# Altium PCB PCB-LAYOUT.PcbDoc (part 2 of 3)
Units mm, origin at the board's own origin, x right, y up, seen from the top; angles counter-clockwise.
Board outline 90 x 80.5 mm, 4 copper layers (Top Layer, Int1 (GND), Int2 (PWR), Bottom Layer), stack 1.564 mm thick; 224 components, 118 nets, 645 pads, 657 vias.
Unrouted connection lines stored in the file: 1.
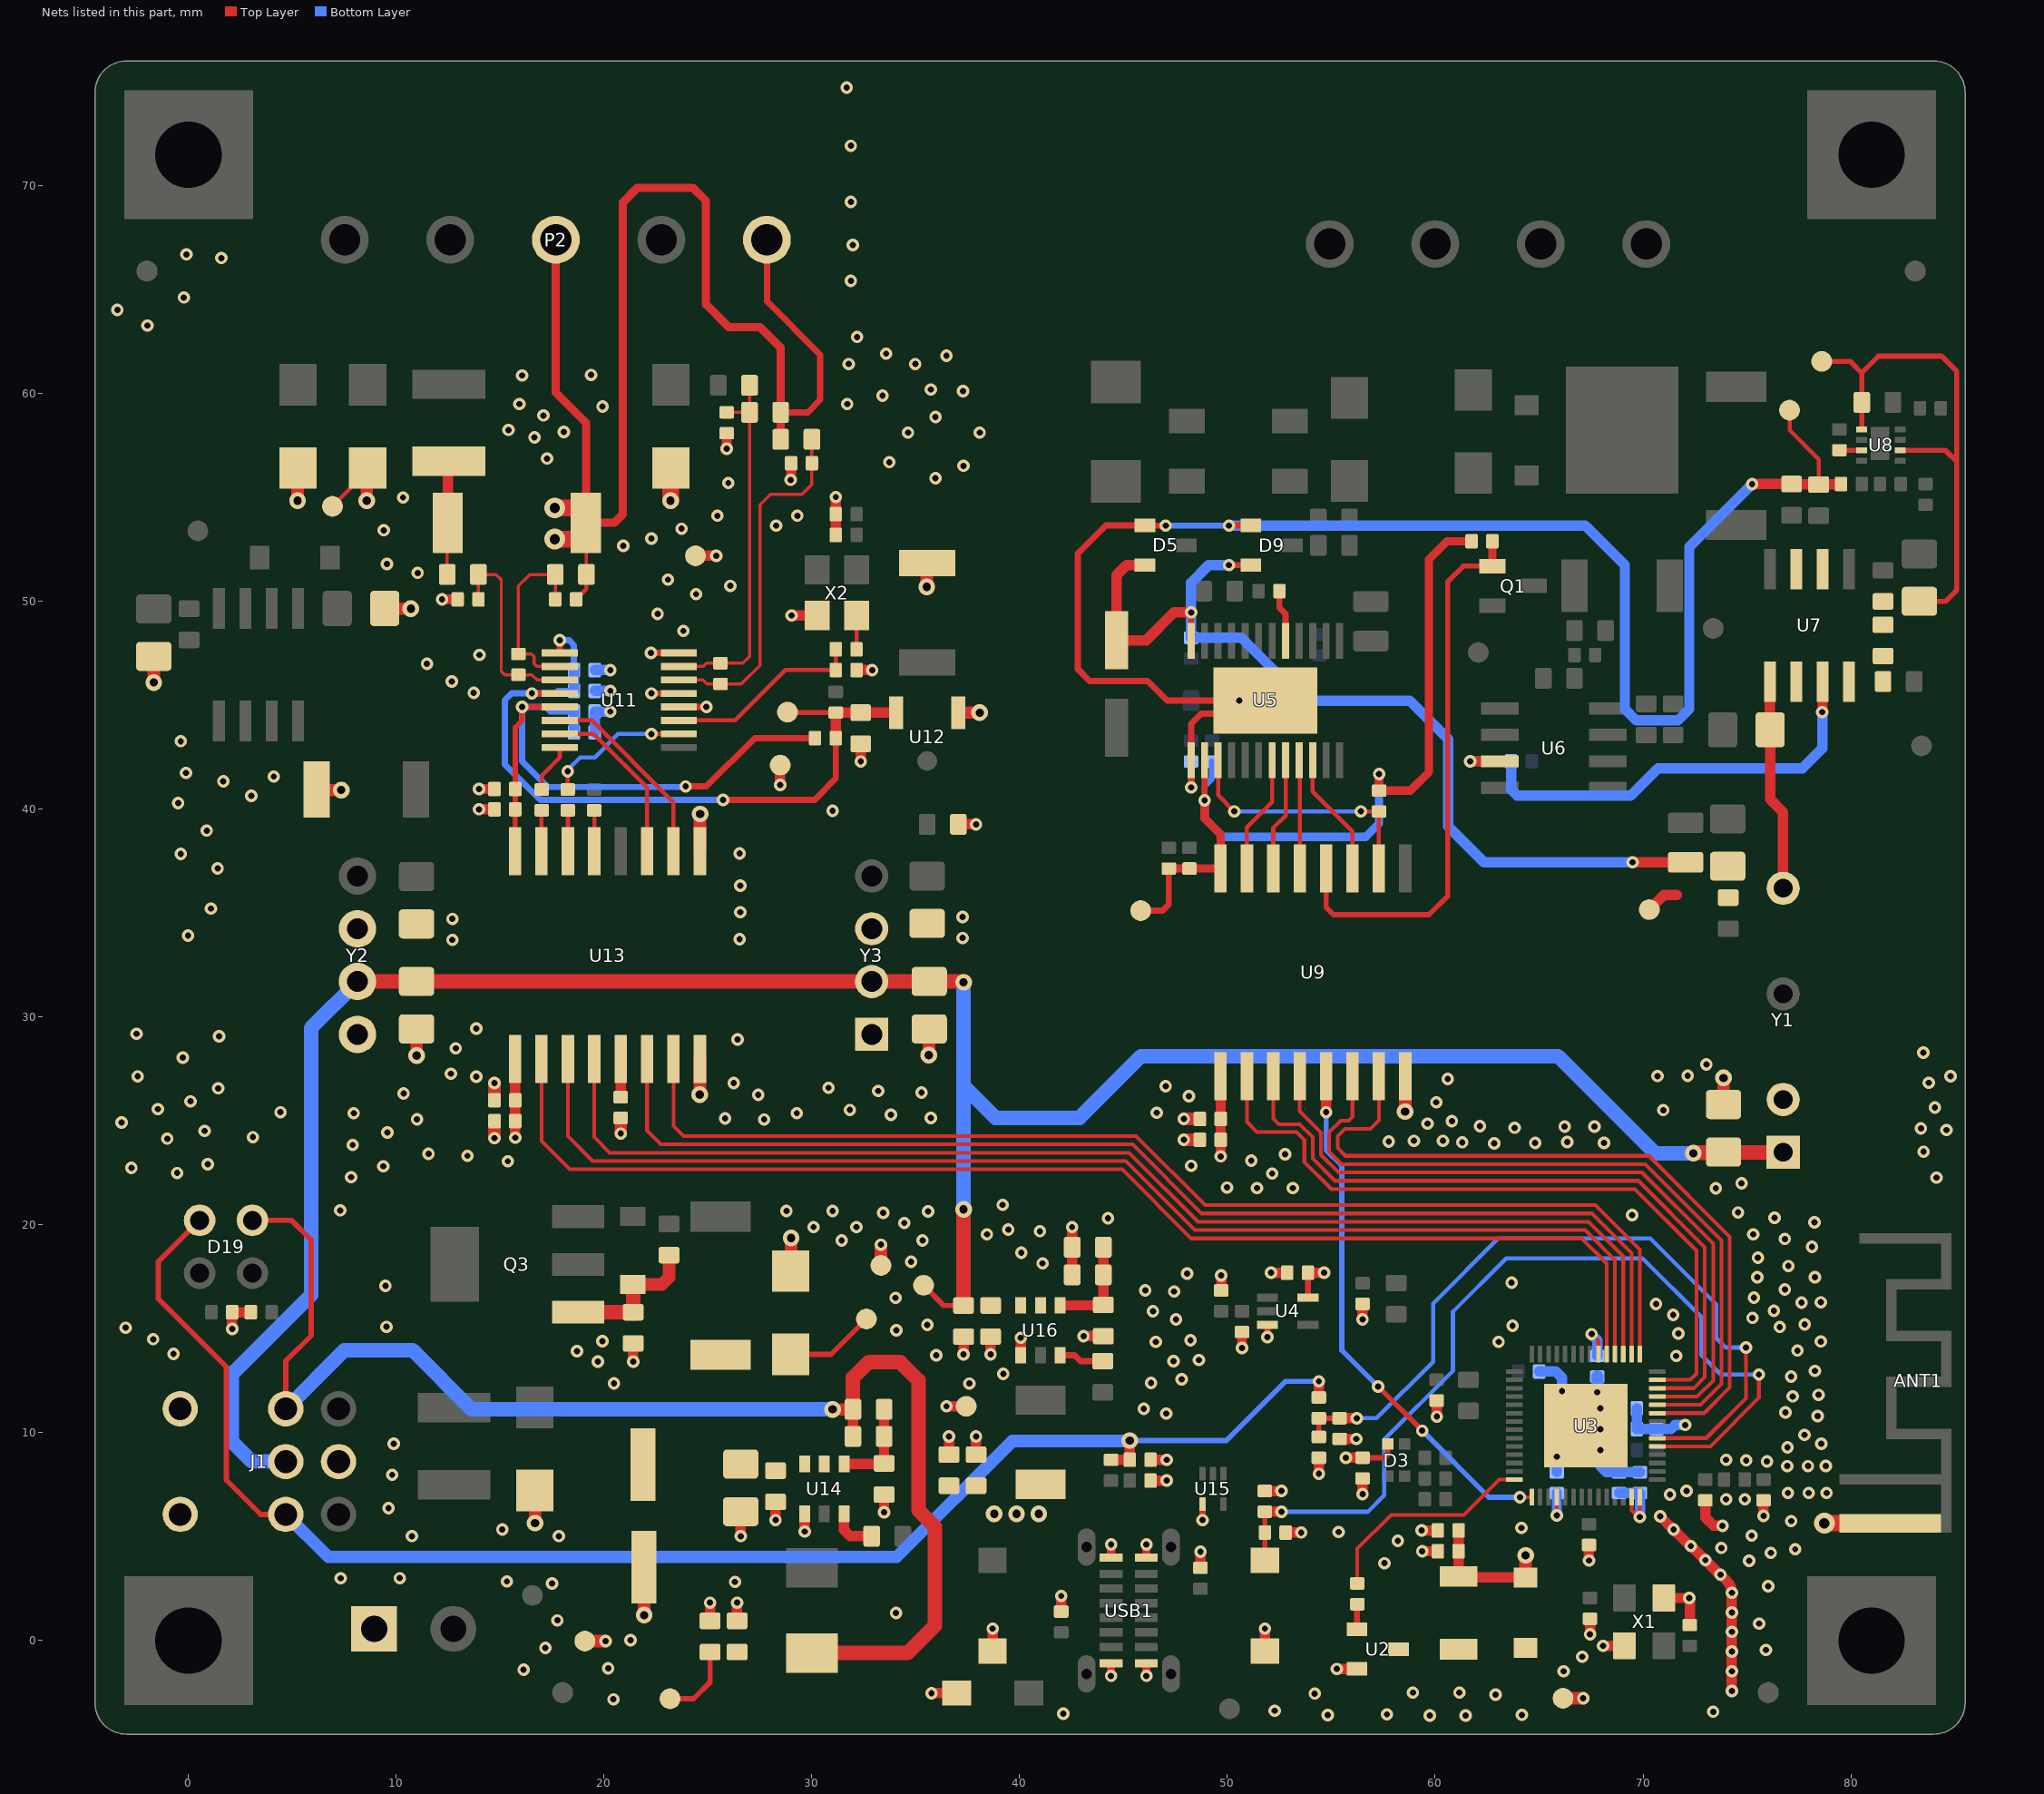
[diagram p4: the nets of this part, all layers, seen from the top]

## Part data
ANT1: library part ANT_IFA_USB_2_4GHZ_50R, "Inverted F 2.4GHz ISM PCB Antenna 50 Ohm", ComponentLink1Description=Datasheet, ComponentLink1URL=https://www.ti.com/lit/an/swra117d/swra117d.pdf
C1 C3 C42 C48 C57: library part CAP_0402, "[C15525]"
C2 C4 C8 C9 C10 C15 C16 C17 C18 C20 C21 C22 C31 C33 C34 C39 C43 C49 C58 C63 C64 C76: library part CAP_0402, "[C307331]"
C5 C6 C7 C32 C35 C40 C62 C65: library part CAP_0402, "[C52923]"
C11: library part CAP_0402, "[C76899]"
C12: library part CAP_0402, "[C76900]"
C13 C14: library part CAP_0402, "Capacitor SMD 0402 [C1548]"
C19: library part CAP_0402, "[C1532]"
C23: library part CAP_ALEL_5x5.4, "[C46550416]"
C24: library part CAP_0805, "[C98192]"
C25 C27 C54 C67: library part CAP_0805, "[C440198]"
C26: library part CAP_0603, "[C307331]"
C28 C44 C45 C46 C47: library part CAP_0805, "[C28323]"
C29: library part CAP_0402, "[C1538]"
C30 C36 C37 C38: library part CAP_0603, "[C19702]"
C41: library part CAP_0402, "[C23733]"
C50 C52: library part CAP_0402, "[C106251]"
C51: library part CAP_0402, "[C880636]"
C53: library part CAP_0805, "[C1779]"
C55: library part CAP_0603, "[C15849]"
C56: library part CAP_0603, "[C96446]"
C59 C61: library part CAP_0402, "[C1523]"
C60: library part CAP_0402, "[C15195]"
C66: library part CAP_ALEL_6.3x5.4, "[C48971023]"
C68 C69 C79: library part CAP_0603, "[C14663]"
C70: library part CAP_0603, "[C1622]"
C71: library part CAP_0603, "[C1671]"
C72 C73 C81 C82: library part CAP_0603, "[C59461]"
C74 C75: library part CAP_0402, "[C12530]"
C77 C78: library part CAP_0603, "[C194427]"
C80: library part CAP_0603, "[C39148]"
D1 D6 D11: library part 1N4148W, "[C917030]"
D2: library part LED_0603_BLUE, "[C965807]"
D3: library part RGB_LED_0805, "[C965848]"
D4: library part LED_0603_YELLOW, "[C89811]"
D5 D9: library part BAT54S_C7420333, "[C7420333]"
D7: library part SMBJ13CA, "[C8848]"
D8 D12 D13 D14: library part SMAJ33CA, "[C19077549]"
D10: library part SMAJ24CA, "[C113963]"
D15: library part BZT52C15, "[C19077412]"
D16 D17: library part SMAJ30CA, "[C10755]"
D18: library part SMF6.0CA, "[C123791]"
D19: library part TJ-L3F2LTQYKMQFLC7K-A5, "[C20613347]"
F1 F2: library part JK-nSMD010/60V, "[C2830236]"
F3: library part BSMD1812-010-60V, "[C883137]"
F4: library part mSMD050-60V, "[C70113]"
FB1: library part FB_0402, "[C76891]"
J1: library part 2MD3T2B1M6RES, "[C545196]"
L1: library part IND_0402, "[C18216]"
L2: library part IND_0402, "[C77108]"
L3: library part FXL0530-6R8-M, "[C177249]"
L4: library part IND-SMD_L4.4-W4.2, "[C5349668]"
P1: "[C2915641]", Color=Green, Current Rating (Max)=18A, JLCPCB Part Class="Extended Part", LCSC Part Name="5.08mm 1x3P 排数:1 每排P数:3 直插", Manufacturer=KANGNEX(康奈克斯电气), Manufacturer Part=WJ500V-5.08-3P, Operating Temperature Range=-40℃~+105℃, Voltage Rating (Max)=250V, Add into BOM=yes, Convert to PCB=yes, Datasheet=https://atta.szlcsc.com/upload/public/pdf/source/20191225/C72334_8A5EF831D67650233B6B1E3F2BC06274.pdf, Device=WJ500V-5.08-3P, Mounting Style=Straight, Number of Pins=3P, Number of PINs Per Row=3, Number of Rows=1, Pitch=5.08mm, Structure=1x3P, Supplier=LCSC, Supplier Footprint=插件,P=5.08mm, Supplier Part=C72334, Symbol=WJ500V-5.08-3P-14-00A, Wire Gauge - AWG=14~30, Wire Gauge - mm2=2.5
P2: "[C2927513]", Color=Green, Current Rating (Max)=18A, JLCPCB Part Class="Extended Part", LCSC Part Name="5.08mm 1x3P 排数:1 每排P数:3 直插", Manufacturer=KANGNEX(康奈克斯电气), Manufacturer Part=WJ500V-5.08-3P, Operating Temperature Range=-40℃~+105℃, Voltage Rating (Max)=250V, Add into BOM=yes, Convert to PCB=yes, Datasheet=https://atta.szlcsc.com/upload/public/pdf/source/20191225/C72334_8A5EF831D67650233B6B1E3F2BC06274.pdf, Device=WJ500V-5.08-3P, Mounting Style=Straight, Number of Pins=3P, Number of PINs Per Row=3, Number of Rows=1, Pitch=5.08mm, Structure=1x3P, Supplier=LCSC, Supplier Footprint=插件,P=5.08mm, Supplier Part=C72334, Symbol=WJ500V-5.08-3P-14-00A, Wire Gauge - AWG=14~30, Wire Gauge - mm2=2.5
P3: library part WJ15EDGRC-3.81-2P, "[C8387]"
P4: library part WJ15EDGK-3.81-2P, "[C8466]"
Q1: library part AO3400A, "[C20917]"
Q2: library part IRLR3110ZTRPBF, "[C67277]"
Q3: library part BSP315P, "[C5246415]"
R1 R6: library part RES_0402, "[C138045]"
R2 R5 R8 R53 R54: library part RES_0402, "[C11702]"
R3 R4 R51 R52: library part RES_0402, "[C25905]"
R7 R9 R31 R32 R33 R39: library part RES_0402, "[C25118]"
R10: library part RES_0603, "[C23162]"
R11 R47: library part RES_0603, "[C25803]"
R12: library part RES_0402, "[C25741]"
R13: library part RES_0805, "[C17414]"
R14 R17: library part RES_0603, "[C23140]"
R15 R41 R44: library part RES_0402, "[C25744]"
R16 R34: library part RES_2512, "[C2775912]"
R18 R28: library part RES_0603, "[C23182]"
R19: library part RES_0603, "[C2933150]"
R20: library part RES_0603, "[C21190]"
R21: library part RES_0603, "[C4190]"
R22: library part RES_0603, "[C23350]"
R23: library part RES_0805, "[C17475]"
R24: library part RES_0603, "[C2998136]"
R25 R36 R38: library part RES_0402, "[C25077]"
R26: library part RES_0402, "[C51048313]"
R27: library part RES_0402, "[C2998054]"
R29: library part RES_2010, "[C2999618]"
R30 R35: library part RES_0603, "[C23041]"
R37: library part RES_2010, "[C2933989]"
R40: library part RES_0603, "[C23129]"
R42: library part RES_0603, "[C25804]"
R43: library part RES_0603, "[C23125]"
R45: library part RES_2512, "[C25489]"
R46: library part RES_0603, "[C22883]"
R48 R56: library part RES_0603, "[C137745]"
R49: library part RES_0402, "[C93947]"
R50: library part RES_0402, "[C2909379]"
R55: library part RES_0603, "[C23266]"
SW1 SW2: "[C720477]", Actuator/Cap Color=Black, Contact Current=50mA, Insulation Resistance=100MΩ, JLCPCB Part Class="Extended Part", LCSC Part Name="4*3*2mm 立贴 轻触开关", Manufacturer=XUNPU(讯普), Operating Force=160gf, Operating Temperature=-30℃~+80℃, Voltage Rating (DC)=12V, Actuator Style="Round Button", Add into BOM=yes, Circuit=SPST, Convert to PCB=yes, Datasheet=https://atta.szlcsc.com/upload/public/pdf/source/20200810/C720475_60D09DD6C54279ADDB2DC25100F1CC11.pdf, Device=TS-1088-AR02016, Manufacturer Part=TS-1088-AR02016, Mechanical Life=10万次, Mounting Style="Brick nogging", Pin Style=SMDSplicing, Strike Gundam=不带, Supplier=LCSC, Supplier Footprint=SMD, Supplier Part=C720477, Switch Height=2mm, Switch Length=4mm, Switch Width=3mm, Symbol=TS-1088-AR02016
T1 T2 T3 T4 T5 T6 T7 T8 T9 T10 T11 T12 T13 T14 T15 T16 T17 T18 T19 T20 T21: "test point"
U1: library part KLJ-4020, "[C556936]"
U2: library part SS8050, "[C2150]"
U3: library part ESP32-S3FN8, "[C2913196]"
U4: library part 74LVC1G14GW,125, "[C265125]"
U5: library part AD5412AREZ-REEL7, "[C27993]"
U6: library part OP184ESZ-REEL7, "[C209423]"
U7 U10: library part LM317LDR2G, "[C7940]"
U8: library part LM27761DSGR, "[C129351]"
U9 U13: library part NSI8262W1-DSWR, "[C5441133]"
U11: library part ADS1220IPWR, "[C48263]"
U12: library part HT7333-A, "[C347191]"
U14 U16: library part AP63301WU-7, "[C2158003]"
U15: library part TPD2E2U06DRLR, "[C1972959]"
USB1: library part TYPEC-305-ACP16H458, "[C5454943]", Current Rating - Power (Max)=3A, JLCPCB Part Class="Extended Part", LCSC Part Name="Type-C 母 卧贴", Manufacturer="XKB Connectivity(中国星坤)", Manufacturer Part=U262-161N-4BVC11, Operating Temperature Range=-40℃~+85℃, Soldering Temperature(Max)=260℃, Add into BOM=yes, Connector Type=Type-C, Contact Material="Copper Alloy", Contact Plating=Gold, Convert to PCB=yes, Datasheet=https://atta.szlcsc.com/upload/public/pdf/source/20211015/B478CBA0F1623DA36A6CC6918C49C838.pdf, Device=U262-161N-4BVC11, Gender=Female, Mounting Style=卧贴, Number of Contacts=16P, Number of Ports=1, Standard="USB 3.1", Supplier=LCSC, Supplier Footprint=SMD, Supplier Part=C319148, Symbol=U262-16XN-4BVC11
X1: library part TSX-3225_24.0000MF15X-AC, "[C5261245]", Manufacturer=Epson, Manufacturer Part Number="TSX-3225 24.0000MF15X-AC"
X2: library part OT32254.096MJBA4SL, "[C2831395]"
Y1: library part B0524S-2WR3, "[C5369477]"
Y2: library part B0524S-1WR3, "[C7500908]"
Y3: library part B0505S-1WR3, "[C7465178]"
FID1 FID2 FID3 FID4: Description_=FIDUCIAL, DNP=DNP, Revision=0

## Free pads (board coordinates)
  rect 6.2x6.2 hole 3.2: MH(0,0) MH(0,71.5) MH(81,0) MH(81,71.5)

## Via types
v1: diameter 0.6, hole 0.3, Top Layer to Bottom Layer, tented both sides, 570 vias
v2: diameter 1, hole 0.4, Top Layer to Bottom Layer, tented both sides, 48 vias
v3: diameter 0.8, hole 0.4, Top Layer to Bottom Layer, tented both sides, 36 vias
v4: diameter 1, hole 0.5, Top Layer to Bottom Layer, tented both sides, 3 vias

## Nets (pads, with @x,y where several pads share a name; then routed paths per layer and width w, separated by ;. In a path a pad name is that pad's centre, name@x,y a point inside that pad or via, vN(x,y) a via of type N, cw(c..) or ccw(c..) an arc to the next point about the centre after c; other vN are vias at no path point)
2_WIRE_T_EN: U3.43 U9.5 | length 25.6
  Top Layer w0.18: v1(64.075,6.9) U3.43@64.65,6.9
  Top Layer w0.25: v1(57.25,12.225) v1(59.375,10.1)
  Top Layer w0.5: U9.5@54.748,27.157 54.75,27.154 v1(54.75,25.425)
  Bottom Layer w0.25: v1(54.75,25.425) 54.75,23.6 55.5,22.85 55.5,13.975 v1(57.25,12.225) ; v1(59.375,10.1) 62.575,6.9 v1(64.075,6.9)
2_WIRE_T_EN_ISO: Q1.G R12.2 U9.12 | length 27
  Top Layer w0.25: U9.12@54.748,37.157 54.748,35.277 55.1,34.925 59.7,34.925 60.6,35.825 60.6,50.95 61.35,51.7 Q1.G@62.75,51.7
  Top Layer w0.4: Q1.G@62.75,51.7 R12.2@62.75,52.9
5V_BANK_LVL: C76.2 R49.1 R50.2 U3.6 | length 37.3
  Top Layer w0.18: U3.6@70.695,9.745 73.045,9.745 74.95,11.65 v1(74.95,14.1)
  Top Layer w0.25: R50.2@54.4,9.8 R49.1@54.4,10.7 C76.2@55.4,10.7
  Top Layer w0.5: C76.2@55.4,10.7 v1(56.225,10.7)
  Bottom Layer w0.2: v1(56.225,10.7) 57.175,10.7 59.897,13.422 59.897,16.22 63.027,19.35 70.35,19.35 73.525,16.175 73.525,14.55 73.975,14.1 v1(74.95,14.1)
+3V3: C1.2 C2.2 C3.2 C4.2 C7.2 C8.2 C9.2 C10.2 C15.2 C16.2 C32.2 C33.2 C62.2 C63.2 C80.2 C81.2 C82.2 D1.1 D3.3 J1.5 L1.1 L4.2 R4.2 R5.2 R55.2 T18.1 U1.1 U3.20 U3.46 U3.55 U3.56 U4.5 U9.1 U13.1 | length 35.4
  Top Layer w0.18: v1(65.85,6.025) U3.46@65.85,6.9 ; v1(67.525,14.75) 67.85,14.425 U3.20@67.85,13.79 ; U3.55@69.45,6.9 69.45,6.27 69.77,5.95 v1(69.85,5.95) U3.56@69.85,6.9
  Top Layer w0.25: C15.2@56.5,8.8 57.575,8.8 57.725,8.95 D3.3@57.725,9.457
  Top Layer w0.3: U4.5@53.875,16.5 C16.2@53.875,17.7
  Top Layer w0.5: U13.1@15.718,27.982 15.725,27.974 C62.2@15.725,26 C63.2@15.725,25 v1(15.725,24.2) ; v1(36.475,11.275) T18.1@37.425,11.275 ; R55.2@42.525,17.6 C80.2@42.525,18.925 v1(42.525,19.9) ; U9.1@49.668,27.157 49.675,27.149 C33.2@49.675,25.1 C32.2@49.675,24.1 v1(49.675,23.3) ; R5.2@49.7,16.85 v1(49.7,17.575) ; R4.2@51.8,7.2 v1(52.6,7.2) ; C16.2@53.875,17.7 v1(54.65,17.7) ; v1(55.7,8.8) C15.2@56.5,8.8 ; C1.2@61.125,5.3 C2.2@61.125,4.3 61.126,4.299 U1.1@61.126,3.088 61.176,3.038 D1.1@64.346,3.038
  Top Layer w0.6: D1.1@64.346,3.038 64.348,3.04 64.348,4.098 v3(64.35,4.1)
  Bottom Layer w0.5: v1(65.85,6.025) C10.2@65.85,7.1 ; v1(67.525,14.75) 67.525,14.723 67.8,14.448 C9.2@67.8,13.7 ; C8.2@68.85,7.1 C7.2@69.85,7.1 v1(69.85,5.95) ; C4.2@69.7,11.175 C3.2@69.7,10.175 71.35,10.175 71.545,10.37 72.02,10.37 v1(72.025,10.375)
  other v3: 38.775,6.1 39.85,6.1 40.922,6.1
+5V_FIELD: C71.2 C72.2 C73.2 D19.1 J1.3 L3.2 R46.2 T15.1 | length 70.4
  Top Layer w0.25: D19.1@3.075,20.221 4.954,20.221 5.9,19.275 5.9,14.675 4.68,13.455 J1.3@4.68,11.152 ; T15.1@23.175,-2.8 24.3,-2.8 25.1,-2 C72.2@25.1,-0.55
  Top Layer w0.5: R46.2@31.975,9.825 C71.2@31.975,11.125
  Top Layer w0.6: v3(31,11.125) C71.2@31.975,11.125
  Top Layer w0.7: L3.2@30,-0.6 34.6,-0.6 35.925,0.725 35.925,5.475 35.125,6.275 35.125,12.525 34.25,13.4 32.725,13.4 31.975,12.65 C71.2@31.975,11.125
  Bottom Layer w0.7: J1.3@4.68,11.152 7.503,13.975 10.775,13.975 13.625,11.125 v3(31,11.125)
+5V_SYS: C24.2 C44.2 C53.2 C77.2 C78.2 J1.2 T17.1 U16.2 U16.3 Y1.1 Y2.2 Y3.2 | length 118
  Top Layer w0.25: T17.1@35.375,17.1 36.35,16.125 C78.2@37.3,16.125
  Top Layer w0.6: v3(72.425,23.45) v3@72.453,23.479 ; C24.2@73.846,23.479 C24.2@73.875,23.507 C24.2@73.885,23.497
  Top Layer w0.7: Y2.2@8.134,31.712 10.969,31.712 C53.2@10.975,31.718 32.871,31.718 Y3.2@32.879,31.71 32.887,31.718 C44.2@35.65,31.718 37.203,31.718 37.246,31.675 v3(37.3,31.675) ; C78.2@37.3,16.125 v3(37.3,20.75) ; v3@72.453,23.479 C24.2@73.846,23.479 ; C24.2@73.885,23.497 Y1.1@76.744,23.497
  Bottom Layer w0.7: J1.2@4.68,8.612 4.676,8.616 3.059,8.616 2.075,9.6 2.075,12.8 5.9,16.625 5.9,29.478 Y2.2@8.134,31.712 ; v3(37.3,20.75) 37.3,26.688 ; v3(37.3,31.675) 37.3,26.688 ; v3(72.425,23.45) 70.575,23.45 65.9,28.125 45.85,28.125 42.875,25.15 38.837,25.15 37.3,26.688
+5V_USB: C75.2 D19.3 FB1.2 J1.1 R49.2 | length 74.9
  Top Layer w0.25: D19.3@0.535,20.221 -1.45,18.236 -1.45,16.45 1.825,13.175 1.825,7.725 3.478,6.072 J1.1@4.68,6.072
  Top Layer w0.5: FB1.2@44.4,8.7 C75.2@45.3,8.7 v3(45.3,9.625) ; R49.2@54.4,11.7 v1(54.4,12.475)
  Bottom Layer w0.25: v3(45.3,9.625) 49.95,9.625 52.8,12.475 v1(54.4,12.475)
  Bottom Layer w0.6: J1.1@4.68,6.072 6.727,4.025 34.075,4.025 39.65,9.6 45.275,9.6 v3(45.3,9.625)
+24V_FIELD: C66.1 C67.2 C68.2 D17.1 R45.2 T14.1 U14.2 U14.3 | length 4.3
  Top Layer w0.25: D17.1@28.98,13.778 30.928,13.778 T14.1@32.625,15.475
-4V_ISO: C30.2 C31.2 C37.2 C38.2 D5.1 D9.1 R25.2 T4.1 U5.1 U5.25 | length 84
  Top Layer w0.2: T4.1@77.054,59.204 77.054,58.246 78.463,56.837 C38.2@78.463,55.638
  Top Layer w0.3: D5.1@46.027,53.651 44.151,53.651 42.8,52.3 42.8,46.75 43.375,46.175 46.15,46.175 47.093,45.232 U5.25@51.824,45.232 51.199,44.607 48.732,44.607 48.25,44.125 U5.1@48.25,42.367 v1(48.25,41.05) ; D5.1@46.128,53.65 v1(47.025,53.65) ; v1(50.075,53.65) v1(50.075,53.65) D9.1@51.127,53.651
  Top Layer w0.5: v1(75.25,55.65) C37.2@77.15,55.65 77.162,55.638 78.438,55.638 C38.2@78.45,55.625 78.463,55.638 79.514,55.638 R25.2@79.527,55.651
  Bottom Layer w0.3: v1(47.025,53.65) v1@50.05,53.65 ; v1(48.25,41.05) C31.2@48.25,42.3
  Bottom Layer w0.5: C30.2@49.75,45.225 v1(50.575,45.225) ; v1(50.075,53.65) 67.225,53.65 69.125,51.75 69.125,44.825 69.675,44.275 71.675,44.275 72.225,44.825 72.225,52.625 v1(75.25,55.65)
ADC_5V_ISO: C28.2 C36.2 C39.2 R21.2 R22.2 T2.1 U6.7 U7.2 U7.3 U7.6 U7.7 U8.1 U8.6 | length 49.6
  Top Layer w0.25: T2.1@78.6,61.55 79.975,61.55 80.527,60.998 ; U8.1@80.523,58.277 80.527,58.281 C36.2@80.527,59.576 80.527,60.998 ; U8.6@82.377,57.276 84.549,57.276 85.1,56.725 ; C28.2@83.3,50.007 84.557,50.007 85.1,50.55 85.1,56.725 ; 80.527,60.998 81.329,61.8 84.375,61.8 85.1,61.075 85.1,56.725
  Top Layer w0.5: v1(61.683,42.308) U6.7@63.109,42.308 ; v1(78.625,44.675) 78.625,44.702 78.644,44.721 U7.3@78.644,46.144
  Bottom Layer w0.5: v1(61.683,42.308) 63.642,42.308 C39.2@63.65,42.3 63.65,40.95 63.95,40.65 69.4,40.65 70.725,41.975 77.675,41.975 78.625,42.925 v1(78.625,44.675)
ADC_24_ISO: C22.2 C23.1 C25.2 C26.2 C27.1 D5.2 D9.2 R13.2 T1.1 U5.24 U7.1 Y1.6 | length 58.7
  Top Layer w0.25: U5.24@48.25,48.1 v1(48.25,49.475)
  Top Layer w0.3: v1(50.075,51.75) 51.125,51.75 D9.2@51.127,51.752
  Top Layer w0.5: D5.2@46.027,51.752 46.021,51.746 45.146,51.746 44.666,51.266 C23.1@44.666,48.129 46.079,48.129 47.425,49.475 v1(48.25,49.475) ; v1(69.5,37.45) R13.2@72.05,37.45 ; T1.1@70.3,35.175 71,35.875 71.625,35.875 ; U7.1@76.104,46.144 76.104,43.839 C27.1@76.118,43.825 76.118,40.482 76.744,39.856 Y1.6@76.744,36.197
  Bottom Layer w0.5: v1(50.075,51.75) 49.1,51.75 48.25,50.9 v1(48.25,49.475) C22.2@48.25,48.25 50.675,48.25 53.7,45.225 58.775,45.225 60.625,43.375 60.625,39.175 62.35,37.45 v1(69.5,37.45)
ADC_CS: U3.18 U13.3 | length 61.1
  Top Layer w0.18: U13.3@18.258,27.982 18.258,24.267 19.45,23.075 45.103,23.075 48.428,19.75 67.216,19.75 68.65,18.316 U3.18@68.65,13.79
ADC_CS_ISO: R32.2 U13.14 | length 2
  Top Layer w0.2: U13.14@18.258,37.982 R32.2@18.258,39.942
  Top Layer w0.3: R32.2@18.25,39.95 R32.2@18.258,39.942
ADC_DIN: U3.19 U13.2 | length 62
  Top Layer w0.18: U13.2@16.988,27.982 16.988,24.037 18.35,22.675 44.937,22.675 48.262,19.35 67.05,19.35 68.25,18.15 U3.19@68.25,13.79
ADC_DIN_ISO: R33.2 U13.15 | length 2
  Top Layer w0.2: U13.15@16.988,37.982 R33.2@16.988,39.938
  Top Layer w0.3: R33.2@16.988,39.938 R33.2@17,39.95
ADC_DOUT/DRDY: U3.16 U13.6 | length 58.1
  Top Layer w0.18: U13.6@22.068,27.982 22.068,24.532 22.725,23.875 45.434,23.875 48.759,20.55 67.547,20.55 69.45,18.647 U3.16@69.45,13.79
ADC_DOUT/DRDY_ISO: U11.15 U13.11 | length 8.3
  Top Layer w0.2: U11.15@17.866,43.625 19.5,43.625 22.068,41.057 U13.11@22.068,37.982
ADC_DRDY: U3.15 U13.7 | length 57.2
  Top Layer w0.18: U13.7@23.338,27.982 23.338,24.762 23.825,24.275 45.6,24.275 48.925,20.95 67.713,20.95 69.85,18.813 U3.15@69.85,13.79
ADC_DRDY_ISO: U11.14 U13.10 | length 9.5
  Top Layer w0.2: U11.14@17.866,44.275 19.4,44.275 23.338,40.337 U13.10@23.338,37.982
ADC_IND: R44.1 U13.5 | length 1.8
  Top Layer w0.5: U13.5@20.798,27.982 20.8,27.979 R44.1@20.8,26.15
ADC_SCLK: U3.17 U13.4 | length 60.4
  Top Layer w0.18: U13.4@19.528,27.982 19.528,24.222 20.275,23.475 45.269,23.475 48.594,20.15 67.381,20.15 69.05,18.481 U3.17@69.05,13.79
ADC_SCLK_ISO: R31.2 U13.13 | length 2
  Top Layer w0.2: U13.13@19.528,37.982 R31.2@19.528,39.947
  Top Layer w0.3: R31.2@19.525,39.95 R31.2@19.528,39.947
ADJ_LM: R22.1 R24.2 U7.4
AIN0: C50.1 C51.2 R30.2 U11.11 | length 9.8
  Top Layer w0.15: C50.1@13.95,50.1 R30.2@13.95,51.3 14.8,51.3 15.05,51.05 15.05,46.65 15.225,46.475 16.525,46.475 16.777,46.223 U11.11@17.866,46.223
AIN0_R: F3.1 R30.1 R34.2 | length 5.5
  Top Layer w0.15: R30.1@12.45,51.3 12.45,53.758 R34.2@12.475,53.783
  Top Layer w0.5: R34.2@12.475,53.783 12.475,56.696 F3.1@12.525,56.746
AIN1: C51.1 C52.2 R35.2 U11.10 | length 8.7
  Top Layer w0.15: C52.2@17.65,50.275 R35.2@17.65,51.3 16.425,51.3 15.875,50.75 C51.1@15.875,47.475 16.5,47.475 16.625,47.35 16.625,47 16.751,46.874 U11.10@17.866,46.874
AIN2: C59.1 C60.2 R40.2 R42.2 U11.7 | length 17.7
  Top Layer w0.15: U11.7@23.599,46.874 24.774,46.874 24.925,47.025 C60.2@25.6,47.025 26.675,47.025 27,47.35 R42.2@27,59.1 ; C59.1@25.9,59.1 26.925,59.1 R42.2@27,59.1 ; R40.2@27,60.4 R42.2@27,59.1
AIN3: C60.1 C61.1 R43.2 U11.6 | length 17.2
  Top Layer w0.15: U11.6@23.599,46.223 24.752,46.223 24.95,46.025 C60.1@25.6,46.025 26.6,46.025 27.5,46.925 27.5,54.65 28,55.15 29.525,55.15 30,55.625 C61.1@30,56.65 R43.2@30,57.8
AVDD_ADC_ISO: C48.2 C49.2 C56.2 R36.1 R38.1 T9.1 U11.9 U11.12 U12.3 | length 37
  Top Layer w0.2: U11.12@17.855,45.562 U11.12@17.866,45.573
  Top Layer w0.25: T9.1@28.825,44.675 28.85,44.65 R38.1@31.15,44.65
  Top Layer w0.3: v1(16.525,45.575) 17.841,45.575 U11.12@17.855,45.562 ; U11.9@17.866,47.524 v1(17.866,48.141) ; v1(25.725,40.45) 30.125,40.45 31.15,41.475 R36.1@31.15,43.425
  Top Layer w0.5: R36.1@31.15,43.425 R38.1@31.15,44.65 C56.2@32.35,44.65 U12.3@34.05,44.65
  Bottom Layer w0.3: v1(17.866,48.141) 17.875,48.132 18.318,48.132 18.55,47.9 C49.2@18.55,46.7 ; C48.2@18.55,45.7 17.775,45.7 17.65,45.575 v1(16.525,45.575) 15.55,45.575 15.225,45.25 15.225,42.15 16.925,40.45 v1(25.725,40.45)
  Bottom Layer w0.5: C48.2@18.55,45.7 C49.2@18.55,46.7
B_SOUND: R1.1 U3.42 | length 10.6
  Top Layer w0.18: R1.1@56.25,2.75 56.25,4.425 57.875,6.05 61.375,6.05 63.07,7.745 U3.42@63.805,7.745
B_SOUND_R: R1.2 U2.B | length 1.2
  Top Layer w0.3: U2.B@56.233,0.538 56.233,1.733 R1.2@56.25,1.75
BOOT_MODE: C18.2 R4.1 SW2.2 U3.5 | length 44.8
  Top Layer w0.18: U3.5@70.695,9.345 73.245,9.345 75.575,11.675 v1(75.575,12.8)
  Top Layer w0.25: SW2.2@51.8,3.861 C18.2@51.8,5.2 R4.1@51.8,6.2
  Top Layer w0.5: R4.1@51.8,6.2 v1(52.6,6.2)
  Bottom Layer w0.2: v1(52.6,6.2) 56.75,6.2 57.55,7 57.55,9.675 60.85,12.975 60.85,15.825 63.422,18.397 69.978,18.397 72.806,15.569 72.806,13.744 73.75,12.8 v1(75.575,12.8)
BST: C69.2 U14.6 | length 2.2
  Top Layer w0.5: U14.6@31.55,6.1 31.55,5.318 31.843,5.025 C69.2@32.875,5.025
BST1: C79.2 U16.6 | length 2.2
  Top Layer w0.3: U16.6@41.952,13.732 42.643,13.732 42.925,13.45 C79.2@44,13.45
C_SOUND: D1.2 U1.2 U2.C
Ccomp: C29.2 U5.17 | length 2.5
  Top Layer w0.3: C29.2@52.5,50.5 52.5,49.7 52.8,49.4 U5.17@52.8,48.1
CLK: R39.2 X2.3 | length 1.6
  Top Layer w0.2: R39.2@32.15,47.7 X2.3@32.15,49.325
CLK_R: R39.1 R41.2 U11.3 | length 9.6
  Top Layer w0.2: U11.3@23.599,44.275 26.3,44.275 28.725,46.7 R41.2@31.15,46.7 R39.1@31.15,47.7
CPOUT: C41.2 U8.3 | length 1.1
  Top Layer w0.25: C41.2@79.452,57.276 U8.3@80.523,57.276
CS_R: R32.1 U11.2 | length 7
  Top Layer w0.2: R32.1@18.25,40.95 v1@18.25,41.9 ; v1(22.275,43.625) U11.2@23.599,43.625
  Bottom Layer w0.2: v1@18.25,41.9 18.85,42.5 19.55,42.5 20.675,43.625 v1(22.275,43.625)
  other v1: 18.25,41.825
DAC_FAULT: U3.9 U9.7 | length 36.9
  Top Layer w0.18: U9.7@57.288,27.157 57.288,25.038 56.875,24.625 55.65,24.625 55.3,24.275 55.3,23.7 55.675,23.325 70.275,23.325 74.175,19.425 74.175,12.185 72.935,10.945 U3.9@70.695,10.945
DAC_FAULT_ISO: R15.1 U5.3 U9.10 | length 12.5
  Top Layer w0.2: U5.3@49.551,42.367 49.551,40.674 v1(50.325,39.9) ; v1(56.425,39.9) R15.1@57.3,39.9 57.288,39.888 U9.10@57.288,37.157
  Bottom Layer w0.2: v1(50.325,39.9) v1(56.425,39.9)
DAC_LATCH: U3.13 U9.2 | length 34.9
  Top Layer w0.18: U9.2@50.938,27.157 50.938,24.962 51.425,24.475 53.325,24.475 53.7,24.1 53.7,23.037 55.012,21.725 69.612,21.725 72.575,18.762 72.575,12.847 72.273,12.545 U3.13@70.695,12.545
DAC_LATCH_ISO: U5.7 U9.15 | length 5.7
  Top Layer w0.2: U9.15@50.938,37.157 50.938,39.138 52.149,40.349 U5.7@52.149,42.367
DAC_SCLK: U3.12 U9.3 | length 34.7
  Top Layer w0.18: U9.3@52.208,27.157 52.208,25.117 52.475,24.85 53.475,24.85 54.1,24.225 54.1,23.203 55.178,22.125 69.778,22.125 72.975,18.928 72.975,12.682 72.438,12.145 U3.12@70.695,12.145
DAC_SCLK_ISO: U5.8 U9.14 | length 5.5
  Top Layer w0.2: U9.14@52.208,37.157 52.208,39.108 52.8,39.7 U5.8@52.8,42.367
DAC_SDIN: U3.11 U9.4 | length 34.4
  Top Layer w0.18: U9.4@53.478,27.157 53.478,25.472 54.5,24.45 54.5,23.369 55.344,22.525 69.944,22.525 73.375,19.094 73.375,12.516 72.604,11.745 U3.11@70.695,11.745
DAC_SDIN_ISO: U5.9 U9.13 | length 5.2
  Top Layer w0.2: U5.9@53.45,42.367 53.478,42.339 U9.13@53.478,37.157
DAC_SDO: U3.10 U9.6 | length 35.4
  Top Layer w0.18: U9.6@56.018,27.157 56.018,25.218 55.825,25.025 55.45,25.025 54.9,24.475 54.9,23.534 55.509,22.925 70.109,22.925 73.775,19.259 73.775,12.35 72.77,11.345 U3.10@70.695,11.345
DAC_SDO_ISO: U5.10 U9.11 | length 6
  Top Layer w0.2: U5.10@54.1,42.367 54.1,40.85 56.018,38.932 U9.11@56.018,37.157
DIN_R: R33.1 U11.16 | length 2.4
  Top Layer w0.2: R33.1@17,40.95 17,41.625 17.866,42.491 U11.16@17.866,42.975
DVCC: C20.2 C34.2 C35.2 R12.1 R15.2 T3.1 U5.2 U9.16 | length 41.7
  Top Layer w0.3: T3.1@45.825,35.125 46.875,35.125 47.175,35.425 C34.2@47.175,37.15 ; v1(48.901,40.426) U5.2@48.901,42.367
  Top Layer w0.4: C34.2@47.175,37.15 48.175,37.15 48.182,37.157 U9.16@49.668,37.157 49.668,38.807 48.901,39.574 v1(48.901,40.426) ; v1(57.3,41.7) R15.2@57.3,40.9 58.8,40.9 59.7,41.8 59.7,52.025 60.575,52.9 R12.1@61.75,52.9
  Bottom Layer w0.3: v1(48.901,40.426) 48.901,41.126 49.25,41.475 C20.2@49.25,42.3
  Bottom Layer w0.4: v1(48.901,40.426) 48.901,39.574 49.8,38.675 56.65,38.675 57.3,39.325 v1(57.3,41.7)
DVDD_ADC: C42.2 C43.2 C64.2 C65.2 R36.2 U11.13 U13.16 | length 30.7
  Top Layer w0.25: U13.16@15.718,37.982 15.718,39.993 C64.2@15.725,40 C65.2@15.725,40.975 15.725,43.95 16.05,44.275 v1(16.05,44.925) ; v1(16.05,44.925) U11.13@17.866,44.925
  Top Layer w0.3: v1(23.925,41.1) 24.925,41.1 27.25,43.425 R36.2@30.15,43.425
  Bottom Layer w0.3: C43.2@18.55,44.7 17.4,44.7 17.175,44.925 v1(16.05,44.925) 16.05,42.3 17.275,41.075 23.9,41.075 v1(23.925,41.1)
  Bottom Layer w0.5: C42.2@18.55,43.7 C43.2@18.55,44.7
FB: C71.1 R46.1 R48.2 U14.1 | length 4.5
  Top Layer w0.5: U14.1@31.55,8.5 33.45,8.5 R48.2@33.475,8.525 R46.1@33.475,9.825 C71.1@33.475,11.125
FB1: C80.1 R55.1 R56.2 U16.1 | length 4.9
  Top Layer w0.5: U16.1@41.952,16.132 44.007,16.132 R56.2@44.025,16.15 R55.1@44.025,17.6 C80.1@44.025,18.925
G_RES: C70.1 D15.2 Q3.1 R47.2 | length 6.9
  Top Layer w0.6: D15.2@21.387,17.133 22.774,17.133 23.125,17.484 C70.1@23.125,18.55
  Top Layer w0.7: Q3.1@18.747,15.799 21.394,15.8 D15.2@21.394,17.126
  Top Layer w0.8: D15.2@21.387,17.133 D15.2@21.394,17.126 ; R47.2@21.394,15.8 R47.2@21.4,15.8
GND: ANT1.2 C1.1 C2.1 C3.1 C4.1 C5.1 C6.1 C7.1 C8.1 C9.1 C10.1 C11.1 C12.1 C13.1 C14.1 C15.1 C16.1 C17.1 C18.1 C24.1 C32.1 C33.1 C44.1 C53.1 C62.1 C63.1 C66.2 C67.1 C68.1 C72.1 C73.1 C74.1 C75.1 C76.1 C77.1 C78.1 C81.1 C82.1 D16.2 D17.2 D18.1 J1.7 J1.8 P3.1 R2.1 R3.1 R8.1 R44.2 R47.1 R48.1 R50.1 R51.1 R52.1 R53.1 R54.1 R56.1 SW1.1 SW2.1 T19.1 T20.1 T21.1 U2.E U3.57 U4.3 U9.8 U13.8 U14.4 U15.4 U16.4 USB1.A1B12 USB1.B1A12 X1.2 X1.4 Y1.2 Y2.1 Y3.1 | length 82.8
  Top Layer w0.3: v1(48.8,5.8) U15.4@48.8,6.565 ; v1(51.925,14.6) U4.3@51.925,15.2
  Top Layer w0.4: v1(44.398,-1.698) USB1.B1A12@44.398,-1.1 ; USB1.A1B12@44.398,4.001 44.4,4.002 v1(44.4,4.625) ; v1@46.1,-1.725 v1(46.1,-1.698) USB1.B1A12@46.1,-1.1 ; USB1.A1B12@46.1,4.001 v1(46.1,4.625)
  Top Layer w0.5: v1(2.1,15) R53.1@2.1,15.8 R54.1@3,15.8 ; v1(21.4,13.425) R47.1@21.4,14.3 ; C72.1@25.1,0.95 v1(25.1,1.825) ; C73.1@26.4,0.95 v1(26.4,1.825) ; v1(26.575,5.025) C67.1@26.575,6.207 ; v1(28.25,5.8) C68.1@28.25,6.675 ; v1(29.65,5.25) U14.4@29.65,6.1 ; v1(33.475,6.175) R48.1@33.475,7.025 ; v1(35.756,-2.531) D18.1@36.962,-2.531 ; C82.1@36.6,8.95 v1@36.6,9.8 ; v1(37.3,13.775) C78.1@37.3,14.625 ; C81.1@37.9,8.95 v1(37.9,9.825) ; v1(38.6,13.775) C77.1@38.6,14.625 ; SW1.1@38.7,-0.509 v1(38.7,0.575) ; U16.4@40.052,13.732 v1(40.052,14.573) ; R51.1@42,1.4 v1(42,2.15) ; v1(43.075,14.65) R56.1@44.025,14.65 ; C74.1@46.3,7.7 v1(47.075,7.7) ; C75.1@46.3,8.7 v1(47.075,8.7) ; R52.1@48.7,3.5 v1(48.7,4.275) ; v1(50.7,14.075) C17.1@50.7,14.85 ; SW2.1@51.8,-0.509 v1(51.8,0.575) ; v1(52.1,17.7) C16.1@52.875,17.7 ; C18.1@52.8,5.2 v1(53.55,5.2) ; v1(54.4,8.025) R50.1@54.4,8.8 ; v1(55.263,-1.362) U2.E@56.233,-1.362 ; C76.1@55.4,9.7 v1(56.2,9.7) ; v1(56.5,7.05) C15.1@56.5,7.8 ; v1(56.5,15.45) R8.1@56.5,16.2 ; v1(59.35,5.3) C1.1@60.125,5.3 ; v1(59.375,4.3) C2.1@60.125,4.3 ; v1(60.075,10.775) R2.1@60.075,11.55 ; v1(67.4,3.85) R3.1@67.4,4.6 ; v1(67.45,0.3) C14.1@67.45,1.05 ; v1(68.075,-0.25) X1.2@69.1,-0.25 ; v1(70.825,5.975) 71.45,5.35 v1(71.475,5.35) 72.275,4.55 v1(72.3,4.55) 72.325,4.55 v1(73,3.875) 73.7,3.175 v1(73.725,3.175) 74.045,2.855 cw(c73.49,2.3) v1(74.275,2.3) v1(74.275,1.35) v1(74.275,0.425) v1(74.275,-0.525) v1(74.275,-1.475) v1(74.275,-2.425) ; X1.4@71,2.05 v1(72.225,2.05) 72.225,2.023 72.25,1.998 C13.1@72.25,0.75 ; C11.1@73,6.75 73,5.925 73.4,5.525 v1(73.825,5.525) ; v1(75.8,6) C12.1@75.8,6.75
  Top Layer w0.6: v3(10.975,28.15) C53.1@10.975,29.432 ; v1(14.725,24.175) C63.1@14.725,25 ; C62.1@14.725,26 v1(14.725,26.825) ; D16.2@16.67,7.224 16.675,7.22 v3(16.675,5.65) ; T20.1@19.075,-0.025 v1(20.075,-0.025) ; v1(20.8,24.4) R44.2@20.8,25.15 ; C66.2@21.92,3.531 21.922,3.528 21.922,1.228 v3(21.925,1.225) ; v3(24.6,26.275) 24.608,26.283 U13.8@24.608,27.982 ; D17.2@28.98,17.776 29,17.796 v3(29,19.375) ; T21.1@33.325,18.05 v1(33.325,19.05) ; v3(35.625,28.175) 35.638,28.188 35.638,29.42 C44.1@35.65,29.432 ; v1(47.9,24.1) C32.1@48.675,24.1 ; v1(47.9,25.1) C33.1@48.675,25.1 ; v3(58.55,25.45) 58.558,25.458 U9.8@58.558,27.157 ; T19.1@66.15,-2.775 v1(67.125,-2.775) ; U3.57@67.25,10.345 67.25,11.4 v1(67.8,11.95) ; C24.1@73.875,25.793 v3(73.875,27.075)
  Top Layer w0.8: v4(78.725,5.65) ANT1.2@81.9,5.65
  Bottom Layer w0.5: C6.1@65,12.95 65.8,12.95 66.1,12.65 v1(66.1,12) ; C10.1@65.85,8.1 v1(65.85,8.85) ; v1(67.95,10.175) C3.1@68.7,10.175 ; v1(67.95,11.175) C4.1@68.7,11.175 ; C5.1@68.7,9.175 v1(67.95,9.175) 67.95,8.393 68.243,8.1 C8.1@68.85,8.1 C7.1@69.85,8.1
  Bottom Layer w0.6: v1(67.8,11.95) C9.1@67.8,12.7
  other v1: 59.735,-3.607 61.463,-3.607 54.827,-3.584 64.175,-3.575 57.675,-3.55 42.098,-3.512 73.376,-3.422 52.275,-3.375 20.45,-2.825 62.9,-2.6 54.2,-2.55 58.925,-2.5 61.163,-2.501 66.175,-1.475 16.125,-1.4 20.197,-1.33 67.075,-0.775 75.911,-0.45 17.175,-0.35 21.275,0.025 75.588,0.817 17.75,0.975 34.05,1.325 76.026,2.615 17.5,2.75 26.3,2.825 15.325,2.85 7.325,3 10.167,3.003 57.55,3.725 75.104,3.836 76.15,4.225 77.325,4.4 73.768,4.458 58.2,4.8 10.75,5.025 17.825,5.025 75.225,5.05 55.35,5.225 15.1,5.35 64.15,5.425 77.132,5.749 9.625,6.375 74,6.8 74.9,6.8 71.3,7.025 76.974,7.103 77.974,7.103 78.834,7.107 72.1,7.2 9.8,7.975 76.94,8.397 77.94,8.397 78.8,8.4 75.965,8.621 74.967,8.671 74,8.7 76.95,9.3 9.875,9.475 78.575,9.475 36.6,9.825 77.775,9.9 78.4,10.8 47.05,10.925 76.85,10.975 45.975,11.15 77.2,11.75 78.45,11.825 20.475,12.375 37.583,12.371 46.325,12.4 47.8,12.575 77.125,12.7 39.212,12.837 78.275,12.975 19.7,13.425 47.4,13.45 48.625,13.5 71.6,13.7 35.988,13.734 -0.725,13.8 18.7,13.925 77.434,13.955 46.55,14.375 63.05,14.375 78.552,14.391 19.922,14.408 48.225,14.45 -1.7,14.5 71.7,14.775 34.06,14.93 -3.031,15.056 9.525,15.1 76.578,15.09 63.725,15.15 35.556,15.196 77.784,15.212 47.525,15.45 75.268,15.527 71.45,15.675 46.415,15.851 76.3,15.875 70.625,16.2 77.627,16.26 78.552,16.278 34.027,16.492 75.338,16.505 47.432,16.8 46.042,16.851 76.825,16.9 9.475,17.075 63.675,17.225 75.495,17.483 78.273,17.483 48.059,17.664 76.998,18.025 41.1,18.15 34.775,18.225 75.53,18.427 40.077,18.664 78.133,18.951 31.435,19.251 35.323,19.251 76.825,19.325 38.425,19.55 75.3,19.55 40.975,19.698 39.45,19.775 30.081,19.897 32.141,19.897 34.448,20.096 78.25,20.125 44.25,20.325 76.325,20.35 69.475,20.475 33.429,20.58 74.575,20.6 35.589,20.647 28.775,20.675 31,20.675 7.3,20.7 39.179,20.969 51.425,21.775 53.15,21.775 73.504,21.763 49.975,21.8 74.744,22.008 84.125,22.275 7.825,22.3 52.15,22.475 -0.55,22.5 -2.75,22.75 9.375,22.825 48.25,22.85 0.925,22.925 15.368,23.063 51.15,23.1 13.425,23.325 52.775,23.4 11.55,23.425 83.5,23.525 7.9,23.85 62.843,23.924 64.811,23.946 68.125,23.95 61.3,23.975 66.356,23.988 57.765,24.009 58.975,24.05 60.375,24.05 -1.025,24.15 3.1,24.225 9.575,24.45 0.775,24.525 84.603,24.567 83.375,24.65 63.825,24.675 66.229,24.728 67.667,24.728 62.15,24.75 59.625,24.875 -3.225,24.925 60.8,25 10.997,25.078 27.7,25.075 25.825,25.125 35.725,25.15 33.804,25.306 7.948,25.376 29.275,25.375 46.6,25.4 4.425,25.425 31.827,25.534 70.975,25.525 -1.475,25.575 84.05,25.65 60.05,25.9 0.1,25.95 48.15,26.2 27.418,26.256 10.35,26.325 35.275,26.375 33.196,26.446 1.425,26.575 30.8,26.6 47.025,26.675 26.24,26.826 83.749,26.843 60.6,27.025 13.848,27.131 -2.45,27.15 70.696,27.162 84.802,27.155 72.15,27.175 12.625,27.275 73.05,27.725 -0.275,28.05 83.493,28.293 12.859,28.499 26.425,28.925 1.475,29.075 -2.5,29.2 13.85,29.45
GND_1: C42.1 C43.1 C45.2 C46.2 C47.1 C48.1 C49.1 C50.2 C52.1 C54.1 C55.1 C56.1 C57.1 C58.1 C59.2 C61.2 C64.1 C65.1 D12.2 D13.2 D14.2 P2.1 P2.3 R29.1 R34.1 R35.1 R37.1 R41.1 R42.1 R43.1 T10.1 T11.1 T12.1 U11.4 U11.5 U11.8 U12.1 U13.9 X2.2 Y2.3 Y3.3 | length 100.4
  Top Layer w0.15: R35.1@19.15,51.4 R34.1@19.15,53.05
  Top Layer w0.2: T11.1@6.925,54.575 7.82,55.47 7.82,55.624 8.575,56.379 D13.2@8.62,56.424 ; C52.1@18.65,50.1 18.65,50.15 18.85,50.35 18.9,50.35 19.15,50.6 R35.1@19.15,51.3
  Top Layer w0.3: v1(22.251,47.524) U11.8@23.599,47.524 ; v1(22.275,45.575) 22.277,45.573 U11.5@23.599,45.573 ; U11.4@23.599,44.925 v1(24.925,44.925) ; P2.1@27.836,67.405 27.836,64.439 30.4,61.875 30.4,59.7 29.8,59.1 R42.1@28.5,59.1
  Top Layer w0.4: P2.3@17.676,67.405 17.676,60.049 19.125,58.6 R34.1@19.125,53.783 20.483,53.783 20.9,54.2 20.9,69.2 21.6,69.9 24.275,69.9 24.9,69.275 24.9,64.3 26,63.2 27.5,63.2 28.5,62.2 R42.1@28.5,59.1 R43.1@28.5,57.8
  Top Layer w0.5: R29.1@6.164,40.955 R29.1@6.194,40.925 ; v1(12.2,50.1) C50.2@12.95,50.1 ; v1@13.95,40.975 C65.1@14.725,40.975 ; v1(13.975,40) C64.1@14.725,40 ; T12.1@24.4,52.2 v1(25.4,52.2) ; v1(25.9,57.35) C59.2@25.9,58.1 ; v1(28.475,41.175) T10.1@28.475,42.125 ; v1(28.975,55.85) 28.975,55.877 29,55.902 C61.2@29,56.65 ; v1(29.025,49.325) X2.2@30.25,49.325 ; C57.1@31.15,53.2 C58.1@31.15,54.2 v1(31.15,55.025) ; R41.1@32.15,46.7 v1(32.9,46.7) ; v1(32.35,42.3) C56.1@32.35,43.15 ; R37.1@35.525,51.825 R37.1@35.55,51.85 ; C55.1@37.05,39.275 v1(37.9,39.275)
  Top Layer w0.6: v3(-1.675,46.1) C47.1@-1.675,47.357 ; v3(5.25,54.85) 5.25,56.504 D12.2@5.27,56.524 ; R29.1@6.194,40.925 v3(7.35,40.925) ; v3@8.575,54.825 v3(8.575,54.85) D13.2@8.575,56.379 ; C46.2@9.443,49.663 9.449,49.656 10.694,49.656 v3(10.7,49.65) ; U13.9@24.608,37.982 24.608,39.758 v3(24.625,39.775) ; v3(35.525,50.7) R37.1@35.525,51.825 ; U12.1@37.05,44.65 v3(38.075,44.65)
  Top Layer w0.8: v4(17.625,53) 18.8,53 19.125,53.325 R34.1@19.125,53.783 ; v4(17.625,54.5) R34.1@18.8,54.5 ; v3(23.2,54.85) 23.2,56.404 D14.2@23.22,56.424
  Bottom Layer w0.5: C42.1@19.55,43.7 C43.1@19.55,44.7 v1(20.3,44.7) ; C48.1@19.55,45.7 v1(20.3,45.7) ; C49.1@19.55,46.7 v1(20.3,46.7)
  other v1: 12.7,33.716 26.525,33.75 37.25,33.807 -0.025,33.925 12.7,34.725 37.25,34.816 26.55,35.05 1.075,35.225 26.55,36.325 1.4,37.15 -0.375,37.85 26.525,37.875 0.875,38.975 31,39.925 -0.5,40.3 3.025,40.65 13.975,40.975 1.675,41.35 4.1,41.575 -0.125,41.75 -0.375,43.275 13.725,45.6 12.675,46.15 11.475,47 14,47.425 23.817,48.586 22.575,49.4 24.425,50.35 26.075,50.75 23.075,51.05 11.025,51.375 9.55,51.8 20.925,52.675 22.275,53.025 9.4,53.425 23.725,53.5 28.275,53.65 25.45,54.125 29.3,54.125 10.325,55 25.975,55.7 35.95,55.925 37.3,56.525 33.725,56.7 17.25,56.875 16.65,57.9 34.625,58.125 38.075,58.125 18.065,58.154 15.4,58.25 35.95,58.875 17.075,58.95 19.925,59.375 15.925,59.5 31.7,59.5 33.4,59.9 37.275,60.125 35.725,60.2 16.05,60.875 19.375,60.9 31.775,61.425 34.975,61.425 36.478,61.828 33.575,61.925 32.175,62.725 -1.975,63.275 -3.425,64.025 -0.225,64.625 31.875,65.425 1.575,66.525 -0.1,66.7 31.966,67.156 31.875,69.225 31.875,71.925 31.675,74.725